# Altium PCB EVB-2.PCBDOC (part 5 of 6)
Units mil, origin at the board's own origin, x right, y up, seen from the top; angles counter-clockwise.
Board outline 2401.57 x 1771.65 mil, 6 copper layers (Top, Mid1-H, Mid2-PWR, GND, Mid3-V, Bottom), stack 59.449 mil thick; 172 components, 166 nets, 823 pads, 550 vias.
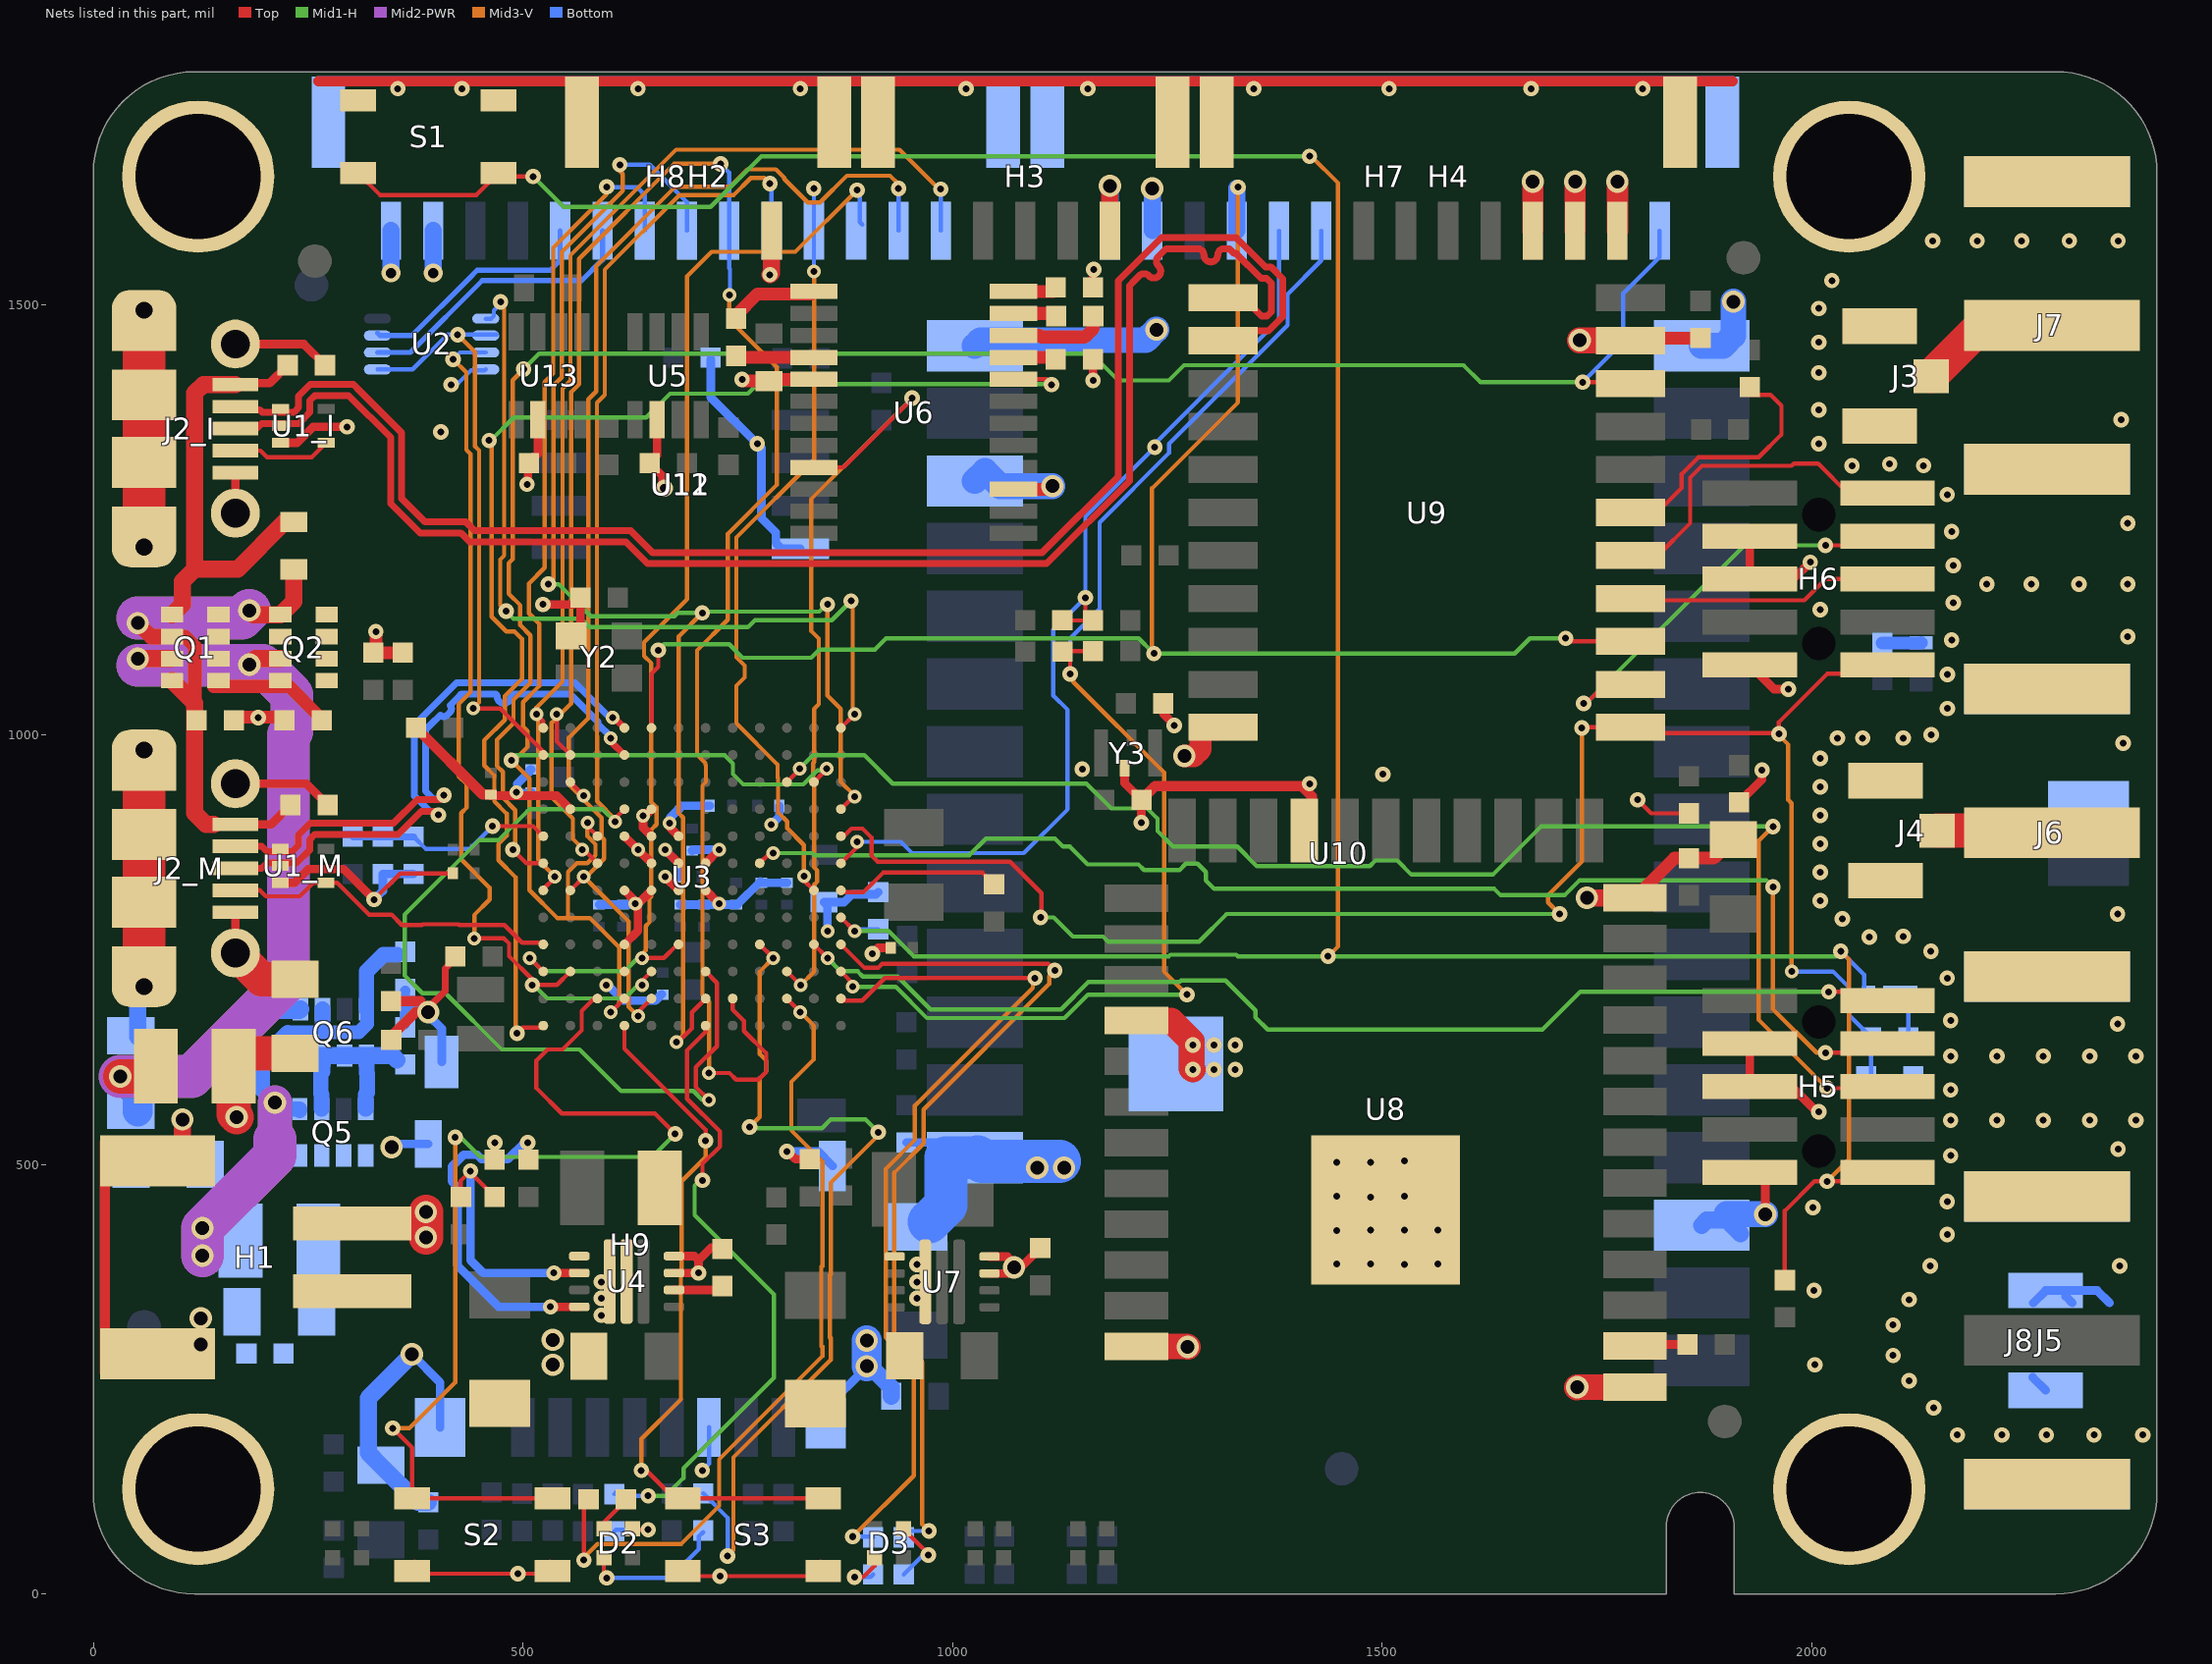
[diagram p7: the nets of this part, all layers, seen from the top]

## Via types
v1: diameter 18, hole 8, Top to Bottom, 385 vias
v2: diameter 16, hole 8, Top to Bottom, 100 vias
v3: diameter 26, hole 16, Top to Bottom, 58 vias
v4: diameter 22, hole 12, Top to Bottom, 3 vias
v5: diameter 20, hole 10, Top to Bottom, 2 vias
v6: diameter 18, hole 8.27, Top to Bottom, 2 vias

## Nets (pads, with @x,y where several pads share a name; then routed paths per layer and width w, separated by ;. In a path a pad name is that pad's centre, name@x,y a point inside that pad or via, vN(x,y) a via of type N, cw(c..) or ccw(c..) an arc to the next point about the centre after c; other vN are vias at no path point) (continued)
GND: BAT1.- C1.2 C2_I.2 C2_M.2 C3.2 C4.2 C5.1 C6.2 C7.2 C8.2 C9.1 C10.2 C11.2 C12.2 C13.1 C14.1 C15.2 C17.2 C18.2 C19.2 C20.2 C21.2 C22.1 C24.1 C25.1 C26.1 C27.1 C28.1 C29.2 C30.1 C31.2 C32.2 C33.2 C34.2 C35.2 C36.2 C37.2 C38.2 C39.2 C40.2 C41.1 C42.2 C43.2 C44.2 C45.2 C46.2 C47.2 C48.2 C49.2 C50.2 C51.1 C52.2 C53.2 C54.2 C55.2 C56.2 C57.1 H1.0 H1.2 H2.0 H2.1 H3.0 H3.1 H4.0 H4.1 H4.2 H4.3 H5.3 H5.5 H5.9 H6.3 H6.5 H6.9 H7.0 H7.1 H7.2 H8.0 H8.1 H8.2 H9.6 H9.M1 H9.M2 H9.M3 H9.M4 H9.S2 J2_I.5 J2_I.6 J2_I.7 J2_I.8 J2_I.9 J2_M.5 J2_M.6 J2_M.7 J2_M.8 J2_M.9 J3.2 J3.3 J4.2 J4.3 J5.2 J5.3 J5.4 J5.5 J6.2 J6.3 J6.4 J6.5 J7.2 J7.3 J7.4 J7.5 J8.2 J8.3 MP1.1 MP2.1 MP3.1 MP4.1 R1.2 R2.2 R4.2 R7.1 R13.1 R23.1 R47.1 R48.2 R49.2 S1.1 S2.2 S3.2 U1_I.3 U1_M.3 U2.4 U3.D2 U3.D5 U3.E4 U3.E5 U3.E6 U3.F5 U3.F6 U3.F7 U3.G4 U3.G5 U3.G6 U3.G7 U3.J4 U4.3 U4.4 U4.10 U4.11 U5.2 U6.5 U6.15 U7.3 U7.4 U7.10 U7.11 U8.1 U8.13 U8.21 U8.28 U8.36 U8.37 U9.11 U9.21 U10.1 U10.11 U10.13 U10.22 U10.35 U10.38 U11.4 U12.4 U13.2 V1.2 Y2.2 Y3.2 | length 11387.3
  Top w5: v1(326.79,808.11) 357.26,838.58 C8.2@418.3,838.58 ; S2.2@374.02,37.4 387.79,23.62 v1(494.12,23.62) 517.72,23.62 S2.2@531.5,37.4 ; C7.2@421.26,739.56 C7.2@421.26,742.13 ; R7.1@467.14,505.41 v1(467.14,525.1) ; S3.2@688.98,37.4 705.71,20.67 v1(729.33,20.67) 829.72,20.67 S3.2@846.46,37.4 ; R13.1@834.27,504.92 R13.1@834.25,505.92 ; v1(1797.24,924.21) 1813,908.46 R23.1@1857.05,908.46
  Top w6: U1_I.3@217.72,1339.76 U1_I.3@217.91,1339.76
  Top w8: v3@392.72,685.04 409.45,701.77 409.45,727.75 C7.2@421.26,739.56
  Top w10: J2_M.7@165.35,746.06 J2_M.5@165.35,793.31 ; J2_M.6@165.35,942.91 247.89,942.91 C2_M.2@272.64,918.17 ; J2_I.7@165.35,1257.87 J2_I.5@165.35,1305.12 ; J2_I.6@165.35,1454.72 244.94,1454.72 C2_I.2@269.55,1430.12 ; U1_M.3@217.52,827.76 234.25,827.76 250.16,843.66 291.24,843.66 v1(326.79,808.11) ; U1_I.3@217.91,1339.76 237.4,1339.76 255.9,1358.27 v1(295.27,1358.27) ; C11.2@462.6,930.11 462.6,929.13 539.37,929.13 U3.D2@555.12,913.39 ; v1(504.7,1291.46) 505.86,1292.63 505.86,1311.83 C57.1@507.02,1312.99 ; C57.1@509.63,1315.6 513.83,1319.8 513.83,1323.6 517.5,1327.26 U13.2@517.5,1364.11 ; v1(523.34,1151.63) 559.11,1151.63 C13.1@566.93,1159.45 566.93,1125.98 Y2.2@556.1,1115.16 ; U3.J4@618.11,755.91 633.86,771.65 v2@633.86,803.15 ; U3.G4@618.11,818.9 629.92,807.09 632.38,804.63 v2@633.86,803.15 ; U3.E4@618.11,881.89 v2(633.86,866.14) U3.F5@649.61,850.39 ; U3.G5@649.61,818.9 v2@633.86,803.15 ; U3.E5@649.61,881.89 639.89,891.61 v2(639.89,905.51) 641.73,905.51 U3.D5@649.61,913.39 ; U5.2@656.04,1366.6 656.04,1325.66 654.45,1324.07 654.45,1319.28 648.16,1312.99 650.59,1312.99 662.58,1301 662.58,1288.81 v5(664.5,1286.9) ; v2(665.35,834.65) U3.G6@681.1,818.9 ; v2(665.35,866.14) U3.F6@681.1,850.39 ; v2(670.89,897.14) 670.89,892.1 U3.E6@681.1,881.89 ; U4.10@675.8,373.52 v1(704.34,373.52) 704.34,388.29 ; U4.11@675.8,393.21 699.42,393.21 704.34,388.29 ; U3.G7@712.6,818.9 v2(728.35,803.15) ; U3.F7@712.6,850.39 v2(728.35,866.14) ; C15.2@737.81,403.05 719.11,403.05 704.34,388.29 ; v1(807.13,515) 808.14,515 817.23,505.91 R13.1@833.67,505.91 ; v1(906.54,745.12) 913.39,751.97 C19.2@928.14,751.97 ; U7.10@1042.93,373.03 v3@1071.47,373.03 ; U7.11@1042.93,392.72 1063.75,392.72 v3@1071.47,385 ; v3@1072.46,373.03 v3@1071.47,373.03 ; C21.2@1101.98,402.56 1079.42,380 v3(1071.47,380) v3@1071.47,373.03 ; v1(1163.39,1412.4) C22.1@1163.39,1437.01 ; C24.1@1163.39,1518.47 C24.1@1163.39,1520.67 1163.39,1540.35 v1(1164.37,1541.34) ; Y3.2@1200.26,960.91 1200.26,943.76 C25.1@1219.8,924.21 1220.47,923.55 1219.73,922.81 v1(1219.73,897.71) ; C26.1@1245.07,1036.42 1245.07,1024.62 1257.94,1011.75 v1(1257.94,1010.88) ; C30.1@1915.35,921.26 1941.93,947.84 v1(1941.93,958.66) ; H5.3@1927.87,640.55 H5.5@1927.87,590.55 1976.38,590.55 2005.9,561.02 v1(2007.87,561.02) ; H6.9@1927.87,1081.1 1955.83,1053.15 v1(1972.44,1053.15) ; H6.3@1927.87,1231.1 H6.5@1927.87,1181.1 1978.35,1181.1 v1(1998.03,1200.79) ; v3(1945.86,441.9) 1945.86,487.2 H5.9@1960.63,487.2
  Top w12: H1.0@13.28,257.87 H1.0@13.28,525.59 ; 261.81,1760.34 1059.06,1760.34 1110.24,1760.34 1907.48,1760.34 ; C5.1@346.46,689.96 380.52,689.96 ; C6.2@346.64,644.68 346.64,648.91 374.89,677.16 v3(389.76,677.16) ; C9.1@375.67,1008.09 453.55,930.21 462.5,930.21 C11.2@462.6,930.11 ; C25.1@1219.8,924.21 1235.66,940.07 1406.39,940.07 1418.31,928.15 U8.21@1418.31,911.42 ; U8.21@1409.13,888.35 U8.21@1409.13,917.01
  Top w15: R1.2@163.7,1020.47 R2.2@220.39,1020.47 ; v1(328.74,1120.08) 329,1119.82 329,1095.47 R4.2@360.24,1095.47 ; v1(754.92,1413.39) 756.69,1411.62 C17.2@786.42,1411.62 ; C17.2@789.37,1411.62 791.34,1413.59 U6.5@838.58,1413.59 ; U6.15@1070.87,1285.64 1112.41,1285.64 v3(1116.14,1289.37) ; U8.13@1793.94,810.22 1840.02,856.3 C27.1@1857.05,856.3 1885.83,856.3 C29.2@1908.46,878.94 ; U9.21@1796.89,1461.61 C28.1@1870.39,1461.61
  Top w20: H1.0@74.8,503.94 103.7,503.94 v3(103.7,552.17) ; v1(787.4,1535.43) 789.37,1537.4 H2.1@789.37,1586.61 ; H3.1@1183.07,1586.61 v3@1183.07,1638.86 ; U9.11@1306.1,1003.11 1305.12,1004.09 U9.11@1309.68,1008.66 ; v3(1738.19,810.22) U8.13@1793.94,810.22 ; U9.21@1793.94,1458.66 U9.21@1796.89,1461.61
  Top w25: H4.3@1675.2,1586.61 v3(1675.2,1643.7) ; H4.2@1724.41,1586.61 v3(1724.41,1643.7) ; H4.1@1773.62,1586.61 v3(1773.62,1643.7)
  Top w26: v3(1269.68,975.39) 1280.71,975.39 1288.39,983.07 U9.11@1288.39,1000.98
  Top w30: U8.36@1213.94,288.16 1272.86,288.16 v3(1273.62,287.4) ; U8.28@1213.94,667.37 1254.21,667.37 1278.19,643.4 1278.19,611.58 v1(1279.53,610.24) ; v3@1726.38,240.16 v3(1726.98,240.76) U8.1@1793.94,240.76 ; v3(1729.71,1459.06) 1793.54,1459.06 U9.21@1793.94,1458.66
  Top w40: J2_M.7@165.35,746.06 195.83,715.58 C1.2@230.81,715.58
  Top w50: J2_M.7@59.06,730.32 J2_M.9@59.06,805.12 J2_M.8@59.06,883.86 J2_M.6@59.06,958.66 ; J2_I.7@59.05,1242.13 J2_I.9@59.05,1316.93 J2_I.8@59.05,1395.67 J2_I.6@59.05,1470.47
  Bottom w5: v1(416.39,1407.48) 418.88,1409.97 425.47,1409.97 439.4,1423.89 455.39,1423.89 U2.4@456.69,1425.2 ; v1(708.7,143.71) 716.54,151.55 H9.6@716.54,193.9
  Bottom w10: v1(326.79,808.11) 337.03,818.36 R47.1@337.03,837.93 C3.2@372.85,837.93 ; v3(347.05,520) 350.67,523.62 H9.M4@389.76,523.62 ; v3(370.83,278.94) 403.54,246.22 H9.M1@403.54,193.9 ; v3(389.76,677.16) 389.76,673.55 405.51,657.8 H9.S2@405.51,619.09 ; v2(492.12,933.07) 493.27,934.22 493.27,942.84 507.94,957.51 507.94,958.74 508.84,959.64 C49.2@509.84,959.64 ; v2@498.82,932.18 508.94,932.18 C50.2@509.84,933.08 ; C48.2@588.58,802.17 C47.2@616.14,802.17 v2@633.86,802.17 ; v2(596.77,708.66) 597.92,707.51 599.89,707.51 616.74,690.66 654.2,690.66 C44.2@661.41,697.87 ; v2(665.35,866.14) 682.08,849.41 C43.2@682.08,834.65 ; v2(670.89,897.14) 670.89,903.17 685.04,917.32 C40.2@717.51,917.32 ; C46.2@683.07,802.17 C42.2@710.63,802.17 C39.2@748.03,802.16 749.37,802.16 776.27,829.05 C38.2@777.56,827.76 C36.2@807.09,827.76 ; C45.2@696.85,865.15 697.84,866.14 v2(728.35,866.14) ; C41.1@718.5,1437.01 718.5,1392.72 v1(772.64,1338.58) 777.56,1333.66 777.56,1252.05 794.37,1235.24 794.37,1223.15 801.18,1216.34 U11.4@822.83,1216.34 ; v2(789.06,895.35) 798.23,904.53 C37.2@798.23,917.32 ; v1(807.13,515) 843.27,515 H9.M3@860.24,498.03 ; H9.M2@852.36,198.82 852.36,216.13 v3@900.01,263.78 ; v2(854.33,771.65) 854.33,801.18 C35.2@850.39,805.12 873.73,805.12 882.92,814.31 910.77,814.31 C34.2@913.38,816.93 ; C32.2@946.17,525.59 1025.82,525.59 U10.1@1025.82,507.87 ; J8.2@2257.01,251.97 J8.2@2272.05,236.93 ; J8.3@2257.56,338.58 J8.3@2272.05,353.07 2331.97,353.07 2346.46,338.58 ; J8.3@2295.28,346.46 J8.3@2303.15,338.58
  Bottom w12: H8.0@261.81,1760.34 1059.06,1760.34 1110.24,1760.34 H7.0@1907.48,1760.34 ; R48.2@362.2,663.39 362.2,682.17 ; R49.2@363.02,701.77 362.2,700.96 362.2,682.17 ; v3(389.76,677.16) 384.76,682.17 362.2,682.17
  Bottom w20: C56.2@51.73,648.31 51.73,699.37 J2_M.7@59.06,706.69 ; v4(346.46,1537.4) H8.1@346.46,1586.61 ; v3(370.83,278.94) 319.88,227.99 319.88,164.37 C52.2@334.65,149.61 377.6,106.65 C51.1@389.76,106.65 ; v4(395.67,1537.4) H8.2@395.67,1586.61 ; v3@900.01,268.89 928.5,240.4 C31.2@928.5,230.32 ; H7.1@1183.07,1586.61 1183.2,1586.74 v3(1183.2,1638.86) ; H7.2@1232.28,1586.61 v3(1232.28,1635.83) ; U10.35@1871.82,429.13 1877.72,435.04 1900.87,435.04 U10.35@1916.62,419.29
  Bottom w30: U10.11@1025.82,1295.28 1037.63,1307.09 1055.35,1289.37 v3(1116.14,1289.37) ; U10.13@1025.82,1452.76 1032.18,1459.12 1224.87,1459.12 v3(1237.2,1471.46) ; U10.22@1871.82,1452.76 1896.73,1452.76 1908.46,1464.49 v3(1908.46,1503.94) ; U10.35@1900.87,441.9 v3(1945.86,441.9)
  Bottom w35: v3(900.01,265) v3(900.01,265) 900.01,268.89 v3(900.01,295)
  Bottom w40: U10.1@1025.82,507.87 1027.79,509.84 U10.1@1028.77,508.86
  Bottom w50: C33.2@972.62,433.25 992.13,452.76 992.13,507.87 U10.1@1025.82,507.87 ; U10.1@1028.77,508.86 1034.19,503.44 v3@1124.5,503.44
  other v1: 2169.29,185.04 2221.06,185.04 2272.82,185.04 2328.34,185.04 2385.02,185.04 2141.73,216.54 2113.01,248.03 2003.44,266.69 2094.49,277.56 2094.49,312.99 591.16,324.31 2113.01,342.52 591.16,344 958.67,344 2002.44,353.07 591.16,363.19 958.67,363.19 2137.8,381.89 2358.27,381.89 958.67,383.37 1525.59,383.37 1446.85,384.11 1486.22,384.11 1564.96,384.11 2157.48,418.31 1446.85,422.73 1486.22,423.23 1525.59,423.23 1564.96,423.23 2001.19,449.8 2157.48,456.69 1486.22,461.61 1446.85,463.09 1525.59,463.09 1446.85,502.13 1486.22,502.13 1525.59,503.94 2161.42,510.05 2356.3,517.7 2161.42,551.18 2215.35,551.18 2269.28,551.18 2323.22,551.18 2377.15,551.18 2161.42,586.61 1304.21,610.24 1329,610.24 2161.42,625.98 2215.35,625.98 2269.28,625.98 2323.22,625.98 2377.15,625.98 1279.53,638.72 1304.21,638.72 1329,638.72 2355.65,663.38 2161.42,667.37 2157.48,716.79 2138.54,748.03 2066.93,764.54 2106.3,765.31 2035.43,785.68 2355.65,791.34 2009.59,806.93 2009.59,840.03 2009.59,873.13 2009.59,906.23 2009.59,939.34 1415.35,942.91 1500.62,953.97 1150.81,960.02 2009.59,972.44 2362.2,990.16 2029.78,996.06 2059.06,996.06 2106.3,996.06 2138.96,1000 192.05,1020 2157.81,1030.56 2157.81,1070.13 2162.58,1110.24 2367.52,1114.17 2009.59,1145.67 2164.45,1153.54 2203.55,1175.19 2255.31,1175.19 2310.83,1175.19 2367.52,1175.19 2164.45,1196.85 2162.58,1236.46 2367.52,1246.06 2157.48,1279.53 2046.65,1312.99 2129.92,1313.14 2090.55,1314.96 2007.87,1338.58 404.53,1352.32 2359.84,1366.54 2007.87,1377.95 2007.87,1421.26 2007.87,1456.69 2007.87,1496.06 2023.2,1528.59 2140.57,1574.8 2192.33,1574.8 2244.09,1574.8 2299.61,1574.8 2356.3,1574.8 354.33,1751.97 429.13,1751.97 633.86,1751.97 822.83,1751.97 1015.75,1751.97 1157.48,1751.97 1350.39,1751.97 1507.87,1751.97 1673.23,1751.97 1803.15,1751.97
  other v2: 630.94,803.19
  other v3: 534.74,266.69 125,290.35 534.74,295.77 125,320.87 1098.43,496.06 1129.7,496.06
GPS1_ANT: J3.1 J7.1 | length 165.2
  Top w40: J3.1@2138.78,1417.32 2197.83,1476.38 J7.1@2279.53,1476.38
GPS2_ANT: J4.1 J6.1 | length 134.9
  Top w40: J4.1@2145.67,888.35 2277.01,888.35 J6.1@2279.53,885.83
GPS.TIMEPULSE: H7.14 U3.F1 U9.20 | length 2188.2
  Top w5: v1(488.19,866.14) 503.93,850.39 U3.F1@523.62,850.39 ; v1(1733.15,1410.32) 1792.28,1410.32 U9.20@1793.94,1408.66
  Mid1-H w5: v1(500.79,1425.42) 519.04,1443.67 1161.4,1443.67 1192.66,1412.4 1251.58,1412.4 1269.3,1430.12 1594.49,1430.12 1614.28,1410.32 v1(1733.15,1410.32)
  Mid3-V w5: v1(488.19,866.14) 491.07,869.02 491.07,912.21 476.62,926.65 476.62,956.73 469.91,963.45 469.91,994.17 489.03,1013.3 489.03,1040.84 508.78,1060.59 508.78,1115.6 496.84,1127.54 496.84,1150.59 483.5,1163.93 483.5,1199.75 488.11,1204.35 488.11,1412.74 v1(500.79,1425.42)
  Bottom w5: v1(1733.15,1410.32) 1780.51,1457.68 1780.51,1513.78 1822.83,1556.1 H7.14@1822.83,1586.61
H1.RAW: C55.1 I8.1 Q5.S1 Q6.G1 Q6.G2 R49.1 | length 578.1
  Mid2-PWR w40: 211.32,529.28 v3(211.32,571.85)
  Mid2-PWR w50: v3(126.99,393.7) v3(126.99,425.69) 211.32,510.01 211.32,529.28
  Bottom w16: 226.35,653.53 236.19,653.53 259.86,653.56 ; 266.73,660.43 259.86,653.56 ; Q6.G2@317.91,680.55 318.75,679.71 318.75,663.38 308.93,653.56 259.86,653.56
  Bottom w18: 226.35,653.53 196.85,624.03 196.85,586.32 v3(211.32,571.85) 218.77,564.41 Q5.S1@240.16,564.41 Q5.S1@240.16,562.51 ; 266.73,660.43 Q6.G1@266.73,680.55 ; Q6.G2@317.91,680.55 317.91,724.41 337.32,743.82 R49.1@353.51,743.82
H1_IN: C54.1 H1.1 I8.2 V1.1 | length 29.3
  Top w40: v3(387.05,415.06) v3(387.05,444.39)
Hdw-Detect-2: U3.K4
I2C0.SCL: H7.6 R18.2 R20.1 U3.K12 | length 1569.3
  Top w5: U3.K12@870.08,724.41 v2@885.83,708.66 ; R18.2@1119.09,1097.12 R20.1@1156.94,1097.12 ; v1(1136.81,1070.87) R18.2@1136.81,1088.6 ; R20.1@1154.53,1099.53 R20.1@1156.94,1097.12 ; R20.1@1163.39,1097.12 R20.1@1156.94,1097.12
  Mid1-H w5: v2(883.9,706.73) 933.66,706.73 970.1,670.29 1130.29,670.29 1157.5,697.49 v1(1272.69,697.49)
  Mid3-V w5: v1(1136.81,1070.87) 1136.81,1067.35 1140.59,1063.57 1140.59,1061.35 1246.07,955.87 1246.07,724.12 v1(1272.69,697.49)
  Bottom w5: v1(1136.81,1070.87) 1136.81,1112.27 1171.03,1146.49 1171.03,1247.1 1251.74,1327.81 1251.74,1338.35 1389.92,1476.54 1389.92,1512.71 1429.13,1551.92 H7.6@1429.13,1586.61
I2C0.SDA: H7.5 R17.2 R19.1 U3.F12 | length 1169.3
  Top w5: U3.F12@870.08,850.39 888.79,869.1 v2(888.79,875.31) ; R17.2@1127.74,1133.17 R17.2@1127.97,1132.94 ; R17.2@1136.81,1124.1 R17.2@1127.97,1132.94 ; R19.1@1154.53,1135.03 v1(1154.53,1159.45) ; R19.1@1163.39,1132.94 R17.2@1127.97,1132.94
  Mid3-V w5: v1@1235.24,1331.41 v1(1235.24,1334.65)
  Bottom w5: v2(888.79,875.31) 939.65,875.31 952.76,862.2 1082.88,862.2 1133.83,913.15 1133.83,1028.89 1117.21,1045.51 1117.21,1122.14 v1(1154.53,1159.45) 1154.53,1253.94 v1(1235.24,1334.65) 1235.24,1338.58 1379.92,1483.27 H7.5@1379.92,1586.61
I-CHIP_ERASE: R25.1 U9.17 | length 293.1
  Top w5: U9.17@1793.94,1258.66 1819.68,1258.66 1848.27,1287.24 1848.27,1303.35 1867.91,1322.99 1938.15,1322.99 1964.57,1349.41 1964.57,1382.87 1951.77,1395.67 R25.1@1927.87,1395.67
I-DATA-RDY: H7.4 U3.A5 U9.14 | length 1900.2
  Top w5: U3.A5@649.61,1007.87 649.61,1071.08 657.48,1078.95 v1(657.48,1098.42) ; v1(1713.48,1112.2) 1717.02,1108.66 U9.14@1793.94,1108.66
  Mid1-H w5: v1(657.48,1098.42) 664.29,1105.23 739.98,1105.23 755.6,1089.6 835.47,1089.6 844.99,1099.12 909.51,1099.12 922.55,1112.17 1216.57,1112.17 1232.34,1096.4 1234.31,1096.4 v1(1234.31,1094.54) 1654.19,1094.54 1671.86,1112.2 v1(1713.48,1112.2)
  Mid3-V w5: v1(1234.31,1094.54) 1232.12,1096.73 1232.12,1286.81 1332.07,1386.76 v1(1332.07,1637.19)
  Bottom w20: H7.4@1330.71,1586.61 v1@1330.71,1635.83
I-SWD.SWDCLK: H6.4 U9.13 | length 503.2
  Top w5: v1(1734.25,1036.33) 1737.22,1036.33 1759.55,1058.66 U9.13@1793.94,1058.66 ; v1(2015.75,1220.47) 2077.24,1220.47 H6.4@2087.87,1231.1
  Mid1-H w5: v1(1734.25,1036.33) 1737.22,1036.33 1921.36,1220.47 v1(2015.75,1220.47)
I-SWD.SWDIO: H6.2 U9.16 | length 383.7
  Top w5: U9.16@1793.94,1208.66 1820.87,1208.66 1858.27,1246.06 1858.27,1299.21 1872.05,1312.99 1976.38,1312.99 1979.1,1315.71 2007.06,1315.71 2041.67,1281.1 H6.2@2087.87,1281.1
I-SWD.SWO: H6.6 U9.15 | length 313.2
  Top w5: U9.15@1793.94,1158.66 1796.1,1156.5 1991.14,1156.5 2015.75,1181.1 2068.19,1181.1 2076.06,1188.98 2085.91,1179.13 H6.6@2087.87,1181.1
I-USB.D_N: J2_I.2 U1_I.1 U9.2 | length 1782.1
  Top w8: J2_I.2@165.35,1381.89 169.29,1377.95 193.9,1377.95 196.65,1375.2 217.91,1375.2 233.47,1375.2 238.97,1380.7 238.97,1394.16 252.49,1407.69 302.63,1407.69 310.24,1400.07 358.97,1351.34 358.97,1306.46 358.97,1274.58 385.99,1247.56 433.47,1247.56 443.62,1237.41 625.23,1237.41 650.54,1212.1 942.13,1212.1 967.81,1212.1 1104.21,1212.1 1192.71,1300.59 1192.71,1528.21 1236.78,1572.28 1243.24,1578.74 1329.79,1578.74 1364.38,1544.15 1370.71,1544.15 1384.06,1530.8 1384.06,1486.74 1367.59,1470.27 1344.02,1470.27 1343.82,1470.47 1343.5,1470.47 U9.2@1331.69,1458.66
I-USB.D_P: J2_I.3 U1_I.2 U9.1 | length 1795.7
  Top w8: J2_I.3@165.35,1356.3 189.96,1356.3 195.87,1362.2 217.91,1362.2 239.17,1362.2 251.97,1375 251.97,1388.78 257.87,1394.69 297.24,1394.69 345.97,1345.96 345.97,1311.85 345.97,1269.19 380.61,1234.56 428.08,1234.56 438.23,1224.41 619.85,1224.41 636.84,1207.41 645.16,1199.1 947.51,1199.1 962.43,1199.1 1109.6,1199.1 1205.71,1295.21 1205.71,1522.83 1211.37,1528.48 1217.02,1534.14 cw(c1222.68,1528.48) 1228.34,1534.14 1228.56,1533.92 ccw(c1234.22,1539.57) 1239.87,1533.92 ccw(c1234.22,1539.57) 1239.87,1545.23 1239.65,1545.46 cw(c1245.31,1551.11) 1239.65,1556.77 1245.31,1562.43 1245.97,1563.09 1248.62,1565.74 1268.52,1565.74 1276.52,1565.74 1285.04,1565.74 cw(c1285.04,1558.26) 1292.52,1558.26 ccw(c1300.52,1558.26) 1300.52,1550.26 ccw(c1300.52,1558.26) 1308.52,1558.26 cw(c1316,1558.26) 1316,1565.74 1322.06,1565.74 1327.71,1560.08 1330.06,1560.08 1359,1531.15 1365.33,1531.15 1371.06,1525.41 1371.06,1492.13 1366.04,1487.11 1359.42,1487.11 1350.96,1495.56 1350.96,1496.91 1339.21,1508.66 U9.1@1314.61,1508.66
I-USB.ID: J2_I.4 U1_I.4 | length 121.6
  Top w5: J2_I.4@169.29,1326.77 J2_I.4@165.35,1330.71 194.35,1330.71 202.22,1322.83 254.13,1322.83 U1_I.4@271.06,1339.76
I-VUSB: C2_I.1 J2_I.1 Q1.S1 R3.1 | length 528.1
  Top w10: J2_I.1@165.35,1407.48 167.04,1409.16 205.29,1409.16 C2_I.1@226.24,1430.12
  Top w20: Q1.S1@91.65,1139.76 103.46,1151.57 103.46,1178.27 118.11,1192.91 ; J2_I.1@165.35,1407.48 127.95,1407.48 118.11,1397.64 118.11,1192.91 ; R3.1@233.11,1247.56 222.74,1247.56 168.09,1192.91 118.11,1192.91
In-VSense: C3.1 R5.1 R47.2 U3.E1 | length 243.5
  Top w5: v1(464.57,893.7) 511.81,893.7 U3.E1@523.62,881.89
  Bottom w5: C3.1@372.85,881.23 387.16,866.92 437.79,866.92 v1(464.57,893.7)
  Bottom w8: R5.1@301.99,881.23 C3.1@372.85,881.23
INS-LED.Rx: R32.2 U3.J12 | length 1033.5
  Top w5: U3.J12@870.08,755.91 897.37,728.62 913.37,728.62 918.04,733.29 1111.19,733.29 v1(1118.83,725.64)
  Mid3-V w5: v1(972.44,73.35) 964.72,81.07 964.72,270.24 932.17,302.8 932.17,490.43 966.17,524.43 966.17,563.8 1112.33,709.95 1112.33,719.14 v1(1118.83,725.64)
  Bottom w5: R32.2@950.39,73.35 v1(972.44,73.35)
INS-LED.Tx: R36.2 U3.L12 | length 1026.4
  Top w5: U3.L12@870.08,692.91 872.44,690.55 894.95,690.55 921.19,716.79 v1(1095.83,716.79)
  Mid3-V w5: v1(883.86,66.71) 954.72,137.58 954.72,266.1 922.17,298.65 922.17,494.57 956.17,528.58 956.17,568.28 1093.34,705.44 1093.34,714.3 v1(1095.83,716.79)
  Bottom w5: v1(883.86,66.71) 906.72,66.71 R36.2@907.48,65.95
INS-R\S\T\: C53.1 H6.10 R54.1 U3.E12 U9.12 | length 2055.6
  Top w5: U3.E12@870.08,881.89 873.44,881.89 882.37,890.81 895.21,890.81 905.51,880.51 905.51,859.48 912.77,852.22 1066.78,852.22 1103.34,815.65 1103.34,788.38 v1(1102.36,787.4) ; v1(1732.28,1007.87) 1733.07,1008.66 1793.94,1008.66 1800.86,1001.74 1960.86,1001.74 v1(1961.61,1000.98) 1961.61,1014.77 2017.71,1070.87 2077.64,1070.87 H6.10@2087.87,1081.1
  Mid1-H w5: v1(1102.36,787.4) 1117.62,787.4 1139.88,765.14 1175.05,765.14 1181.1,759.09 1286.65,759.09 1318.9,791.34 v1(1706.4,791.34)
  Mid3-V w5: v1(1706.4,791.34) 1692.91,804.83 1692.91,813.22 1732.28,852.59 v1(1732.28,1007.87) ; v1(1961.61,1000.98) 1961.61,999.3 1972.44,988.48 1972.44,924.21 1976.38,920.28 v2(1976.38,724.41)
  Bottom w5: v1(1961.61,1000.98) v1@1962.3,1000.3 ; v2(1976.38,724.41) 2024.44,724.41 2043.31,705.54 2043.31,673.47 R54.1@2068.89,647.89 2068.89,604.33 C53.1@2062.99,598.43
INS.FB: R6.1 R7.2 U4.5 | length 313.2
  Top w5: R6.1@427.77,462.11 427.77,481.09 v1(438.9,492.22) 438.9,490.35 R7.2@467.14,462.11
  Top w10: v1(536.04,373.52) U4.5@565.57,373.52
  Bottom w10: v1(438.9,492.22) 438.9,388.34 453.71,373.52 v1(536.04,373.52)
INS.Grn: D3.4 R32.1 | length 80.2
  Top w5: D3.4@942.63,75.79 971.57,46.85 v1(971.57,45.28)
  Bottom w5: R32.1@943.21,22.64 965.84,45.28 v1(971.57,45.28)
INS.PG: R8.1 U4.7 | length 399.7
  Top w5: v1(505.53,525.1) 505.53,506.4 R8.1@506.51,505.41
  Top w10: v1@536.04,334.15 U4.7@565.57,334.15
  Bottom w10: v1(505.53,525.1) 501.48,525.1 482.48,506.1 451.9,506.1 446.77,511.22 431.03,511.22 417.32,497.52 417.32,480.32 423.9,473.74 423.9,382.12 471.87,334.15 v1(532.1,334.15)
INS.Red: D3.2 R36.1 | length 61.3
  Top w5: v1(885.82,19.69) 896.21,19.69 899.16,22.64 909.17,32.65 D3.2@909.17,42.32
  Bottom w5: v1(885.82,19.69) 904.52,19.69 R36.1@907.48,22.64
INS.SS/TR: C15.1 U4.9 | length 64.5
  Top w5: C15.1@731.9,353.84 C15.1@737.81,359.74
  Top w10: U4.9@675.8,353.84 C15.1@731.9,353.84
INS.SW: I3.1 U4.2
INV-UART-EN: U2.2 U2.5 U3.B1 | length 710.5
  Top w5: v2(441.95,1030.56) 473.57,1030.56 523.62,980.51 U3.B1@523.62,976.38
  Mid3-V w5: v1(424.1,1465.62) 444.13,1445.59 444.13,1335.68 449.03,1330.78 449.03,1037.64 v2(441.95,1030.56)
  Bottom w5: U2.5@330.71,1425.2 371.59,1425.2 412.02,1465.62 v1(424.1,1465.62) U2.2@469.56,1465.62
Lblu: D2.3 R10.1 | length 43.4
  Top w5: D2.3@594.11,75.79 594.11,83.28 615.76,104.94 R10.1@615.76,110.24
Lgrn: D2.4 R42.1 | length 58.7
  Top w5: D2.4@627.57,75.79 628.56,74.8 v1(645.67,74.8)
  Bottom w5: R42.1@606.3,72.83 608.27,74.8 v1(645.67,74.8)
LOG.blu: R10.2 U3.L10 | length 940.9
  Top w5: R10.2@568.9,106.68 R10.2@570.86,108.65 ; v1(570.86,39.37) R10.2@570.86,108.65 ; R10.2@572.46,110.24 R10.2@570.86,108.65 ; U3.L10@807.09,692.91 v2(822.83,677.17)
  Mid3-V w5: v1(570.86,39.37) 570.86,42.32 586.85,58.3 684.29,58.3 728.35,102.36 728.35,156.6 848.43,276.68 848.43,288.14 847.2,288.14 847.2,381.14 848.43,381.14 848.43,503.42 812.28,539.57 812.28,596.02 838.12,621.86 838.12,661.88 v2(822.83,677.17)
LOG.grn: R42.2 U3.M7 | length 738.6
  Top w5: v1(708.96,481.32) 708.96,500.59 729.1,520.72 729.1,538.33 691.03,576.39 691.03,632.61 712.6,654.17 U3.M7@712.6,661.42
  Mid1-H w5: v1(645.67,114.17) 666.05,114.17 686.78,134.9 686.78,146.19 792.13,251.54 792.13,272.4 792.13,348.62 699.8,440.94 699.8,475.32 705.81,481.32 v1(708.96,481.32)
  Bottom w5: R42.2@606.3,116.14 608.27,118.12 612.22,114.17 v1(645.67,114.17)
LOG.red: R40.2 U3.J9 | length 1050
  Top w5: U3.J9@775.59,755.91 v2(791.34,740.16)
  Mid1-H w5: v1(763.78,543.31) 764.97,542.11 848.04,542.11 858.15,552.22 898.56,552.22 v1(913.38,537.4)
  Mid3-V w5: v1(738.19,44.29) 744.85,50.95 744.85,158.96 858.43,272.54 858.43,298.14 857.2,298.14 857.2,371.14 858.43,371.14 858.43,478.87 913.38,533.82 v1(913.38,537.4) ; v1(763.78,543.31) 775.55,555.08 775.55,600.09 783.21,607.75 783.21,620.59 775.62,628.19 775.62,724.44 v2(791.34,740.16)
  Bottom w5: R40.2@709.65,117.13 738.19,88.58 v1(738.19,44.29)
Lred: D2.2 R40.1 | length 167.9
  Top w5: D2.2@594.11,42.32 594.11,24 597.44,20.67 v1(597.44,18.7)
  Bottom w5: v1(597.44,18.7) 671.26,18.7 704.72,52.17 704.72,66.93 R40.1@709.65,71.85
M-CHIP_ERASE: R53.1 U3.G12 | length 194.2
  Top w5: U3.G12@870.08,818.9 871.82,818.9 873.9,816.81 896.43,816.81 919.11,839.49 1034.64,839.49 R53.1@1048.34,825.79
M-G1/TXD1/TIOA1: U2.1 U3.A12 | length 974.8
  Top w5: U3.A12@870.08,1007.87 v2(885.83,1023.62)
  Mid1-H w5: v1(480.34,1143.76) 488.96,1135.13 567.5,1135.13 577.41,1125.23 761.97,1125.23 770.01,1133.28 859.37,1133.28 v1@881.75,1155.66
  Mid3-V w5: v1(473.87,1503.88) 478.11,1499.64 478.11,1208.5 473.5,1203.89 473.5,1150.6 v1(480.34,1143.76) ; v1(881.75,1155.71) 883.79,1153.67 883.79,1025.66 v2(885.83,1023.62)
  Bottom w5: U2.1@456.69,1484.25 462.95,1484.25 466.09,1487.4 466.09,1493.65 473.87,1501.43 v1(473.87,1503.88)
M-G1/TXD1/TIOA1_INV: H8.5 U2.7 | length 284.6
  Bottom w6: U2.7@330.71,1467.52 333.66,1464.57 370.81,1464.57 436.9,1530.66 ; 436.94,1530.66 446.9,1540.62 531.76,1540.62 543.31,1552.17 H8.5@543.31,1586.61
M-G2/RXD1/TIOB1: U2.3 U3.K2 U3.K5 | length 1061
  Top w5: v2(443.39,762.96) 477.96,762.96 483.88,757.04 483.88,742.23 510.92,715.19 v1(510.92,708.7) 539.4,708.7 U3.K2@555.12,724.41 ; v2@633.86,708.66 U3.K5@649.61,724.41
  Mid1-H w5: v1@516.63,704.57 528.04,693.16 618.36,693.16 v2@633.86,708.66
  Mid3-V w5: v1(418.82,1437.01) 434.13,1421.7 434.13,1331.54 439.03,1326.64 439.03,1049.56 425.12,1035.65 425.12,951.66 434.61,942.17 434.61,915.37 428.07,908.82 428.07,855.11 461.38,821.79 461.38,808.12 443.39,790.14 v2(443.39,762.96)
  Bottom w5: v1(418.82,1437.01) 426.69,1444.88 U2.3@456.69,1444.88
  other v2: 638.78,708.66
M-G2/RXD1/TIOB1_INV: H8.6 U2.6 | length 340.4
  Bottom w6: U2.6@330.71,1444.88 369.05,1444.88 452.76,1528.59 568.37,1528.59 592.52,1552.74 H8.6@592.52,1586.61
M-G3/SCK1/TIOA0/QDA: H8.7 U3.C11 U3.E3 U3.L4 | length 1784.4
  Top w5: v2(575.12,897.64) 575.12,893.38 U3.E3@586.61,881.89 ; v2(602.36,677.17) U3.L4@618.11,692.91 ; U3.C11@838.58,944.88 v2@850.39,956.69
  Mid1-H w5: v1(486.41,970.28) 492.26,976.13 734.77,976.13 744.34,966.55 744.34,954.21 756.38,942.17 826.29,942.17 842.78,958.66 v2@854.33,958.66
  Mid3-V w5: v2(575.12,897.64) 575.12,881.83 584.4,872.56 584.4,859.72 575.07,850.39 562.58,850.39 552.44,840.26 552.44,787.64 553.37,786.7 ; v1(597.44,1637.61) 597.44,1629.14 535.22,1566.92 535.22,1420.33 525.37,1410.49 525.37,1194.38 506.84,1175.84 506.84,1154.73 506.84,1141.2 518.78,1129.26 518.78,1056.45 500.25,1037.92 500.25,1009.33 505.44,1004.14 505.44,985.86 489.86,970.28 v1(486.41,970.28) 488.13,968.56 507.62,949.06 507.62,819.02 539.94,786.7 553.37,786.7 ; v2(602.36,677.17) 612.27,687.08 612.27,752.17 577.74,786.7 553.37,786.7
  Bottom w5: v1(597.44,1637.61) 598.01,1637.04 632.82,1637.04 641.73,1628.13 H8.7@641.73,1586.61
  other v2: 853.39,960.68
M-G4/CS1/TIOB0/QDB: H8.8 U3.D12 U3.L7 | length 1843.3
  Top w5: v2(678.69,642.18) 680.55,642.18 696.64,658.28 696.64,676.96 U3.L7@712.6,692.91 ; U3.D12@870.08,913.39 v2@885.83,929.13
  Mid1-H w5: v1(529.52,1175.19) 541.58,1175.19 578.85,1137.93 676.4,1137.93 680.2,1141.73 704.33,1141.73 v1@708.66,1146.06 ; v1(708.66,1141.73) 710.2,1143.28 844.9,1143.28 853.2,1151.57 v1(854.33,1151.57)
  Mid3-V w5: v1(529.52,1175.19) 535.59,1181.26 535.59,1406.56 545.22,1416.19 545.22,1562.05 616.14,1632.98 616.14,1652.66 612.8,1656.01 v1(612.8,1663.39) ; v2(678.69,642.18) 686.39,649.88 686.39,903.56 681.35,908.6 681.35,1114.42 v1(708.66,1141.73) ; v1(854.33,1151.57) 854.33,1045.54 869.83,1030.04 869.83,945.13 885.87,929.09 v2(885.87,928.19)
  Bottom w5: v1(612.8,1663.39) 647.41,1663.39 690.94,1619.85 H8.8@690.94,1586.61
M-G5/DA0/TIOA6/AD4: H8.9 U3.B2 U3.F3 U3.L8 | length 2310.2
  Top w5: v2(539.37,1023.62) 539.37,992.13 U3.B2@555.12,976.38 ; v2@570.87,866.14 U3.F3@586.61,850.39 ; v2(716.53,606.3) 740.41,606.3 748.03,598.67 774.14,598.67 783.21,607.75 783.21,629.23 757.3,655.14 757.3,666.89 744.09,680.1 U3.L8@744.09,692.91
  Mid3-V w5: v2(568.9,866.14) 568.9,868.11 558.1,878.91 558.1,902.53 533.37,927.26 533.37,1013.69 541.34,1021.65 556.05,1036.37 556.05,1398.74 565.22,1407.9 565.22,1553.77 675.82,1664.37 v1(729.93,1664.37) ; v2(716.53,606.3) 716.53,689.22 708.91,696.85 708.91,940.94 712.85,944.88 712.85,964.57 712.35,965.06 712.35,967.05 702.61,976.79 702.61,1098.2 738.29,1133.88 738.29,1233.62 795.28,1290.61 795.28,1428.15 740.16,1483.27 v2(740.16,1511.81)
  Bottom w5: v1(729.93,1664.37) 740.16,1654.14 H8.9@740.16,1586.61 740.16,1543.02 740.91,1542.27 740.91,1512.56 v2(740.16,1511.81)
M-G6/DA1/TIOB6/AD5: H8.10 U3.D4 U3.K7 | length 1927.3
  Top w5: v2(607.12,898.78) 607.12,902.4 U3.D4@618.11,913.39 ; U3.K7@712.6,724.41 725.81,711.2 725.81,637.49 701.03,612.72 701.03,590.3 v2(716.53,574.8)
  Mid1-H w5: v2(607.12,898.78) 592.76,913.14 507.34,913.14 471.4,877.2 448.99,877.2 362.28,790.48 362.28,719.82 383.02,699.09 409.78,699.09 475.21,633.66 565.86,633.66 614.22,585.3 698.26,585.3 708.76,574.8 v2(716.53,574.8)
  Mid3-V w5: v2(607.12,898.78) 607.12,901.7 586.37,922.46 586.37,998.55 586.05,998.86 586.05,1386.31 595.22,1395.48 595.22,1541.34 681.74,1627.87 745.05,1627.87 765.13,1647.95 780.9,1647.95 v1(787.4,1641.45)
  Bottom w5: v1(787.4,1641.45) 789.37,1639.48 H8.10@789.37,1586.61
M-G7/TIOB7/AD10: H8.11 U3.G11 | length 900.1
  Top w5: v2(826.99,835.53) 826.99,830.49 U3.G11@838.58,818.9
  Mid3-V w5: v2(826.99,835.53) 826.99,871.57 807.33,891.22 807.33,899 796.84,909.49 796.84,949.67 796.39,950.11 796.39,965.15 748.29,1013.26 748.29,1057.04 758.03,1066.78 758.03,1080.45 748.29,1090.2 748.29,1229.48 838.83,1320.03 838.83,1539.12 v2(838.58,1539.37)
  Bottom w5: v1(838.39,1635.82) 838.58,1635.62 H8.11@838.58,1586.61 v2(838.58,1539.37)
M-G8/TIOB10/AD4: H8.12 U3.J6 U3.K1 | length 1325.9
  Top w5: v2(507.87,740.16) U3.K1@523.62,724.41 ; v2@633.86,740.16 664.03,740.16 679.78,755.91 U3.J6@681.1,755.91
  Mid1-H w5: v2(507.87,740.16) 523.37,724.66 618.36,724.66 v2@633.86,740.16
  Mid3-V w5: v2@633.86,740.16 642.86,749.16 642.86,777.35 647.15,781.64 647.15,809.32 649.36,811.53 649.36,889.51 655.39,895.54 655.39,903.56 655.39,915.48 649.36,921.51 649.36,1083.21 640.98,1091.59 640.98,1107.68 690.94,1157.64 690.94,1533.46 719.49,1562.01 816.93,1562.01 v1(888.78,1633.86)
  Bottom w5: v1(888.78,1633.86) 891.89,1630.75 891.89,1596.66 H8.12@894.87,1593.69
  other v2: 638.78,740.16
M-G9/TIOA9/AD1: H8.13 U3.C2 U3.G2 U3.L5 | length 1501.4
  Top w5: U3.G2@555.12,818.9 v2(570.87,834.65) ; U3.C2@555.12,944.88 v2(570.87,929.13) ; v2(633.89,672.28) 633.89,677.2 U3.L5@649.61,692.91
  Mid3-V w5: v2(633.89,672.28) 622.8,683.36 622.8,782.71 v2(570.87,834.65) 573.47,834.65 594.4,855.58 594.4,877.93 591.44,880.89 591.44,903.24 570.87,923.82 v2(570.87,929.13) 566.3,929.13 553.37,942.06 553.37,996.55 576.05,1019.23 576.05,1390.46 585.22,1399.62 585.22,1545.48 677.6,1637.87 740.91,1637.87 760.99,1657.95 794.23,1657.95 803.9,1648.28 803.9,1646.97 831.55,1619.32 845.7,1619.32 876.97,1650.59 927.17,1650.59 937.01,1640.75 v1(937.01,1635.82)
  Bottom w5: H8.13@937.01,1586.61 v1(937.01,1635.82)
M-G10/TIOB9/AD2: H8.14 U3.A1 U3.G1 | length 1338
  Top w5: v2(515.75,1023.62) 523.62,1015.75 U3.A1@523.62,1007.87 ; U3.G1@523.62,818.9 523.62,820.13 536.94,833.45 v2(536.94,834.69)
  Mid3-V w5: v2(536.94,834.69) 536.94,835.17 517.62,854.49 517.62,1021.74 v2(515.75,1023.62) 515.75,1031.5 546.05,1061.8 546.05,1402.88 555.22,1412.05 555.22,1557.91 678.18,1680.87 938.22,1680.87 984.17,1634.92 v1(986.27,1634.92)
  Bottom w5: H8.14@986.22,1586.61 H8.14@986.22,1586.61 v1(986.27,1634.92)
M-R\E\S\E\T\: C34.1 D7.C H5.10 R9.1 S1.2 U3.H12 | length 3904.8
  Top w5: S1.2@308.09,1653.71 333.65,1628.15 445.92,1628.15 S1.2@471.48,1653.71 475.5,1649.69 v1(511.81,1649.69) ; U3.H12@870.08,787.4 v2(885.83,771.65) ; R9.1@1968.5,365.21 1968.5,445.87 2002.95,480.31 v1(2017.71,480.31) 2077.64,480.31 H5.10@2087.87,490.55 ; v1@2033.46,746.06 v1(2033.46,748.03)
  Mid1-H w5: v1(511.81,1649.69) 547.32,1614.17 718.35,1614.17 777.41,1673.23 807.51,1673.23 v1(1415.35,1673.23) ; v2(885.83,771.65) 925.3,771.65 954.81,742.14 1111.99,742.14 1251.58,742.14 1253.43,743.99 1330,743.99 1331.85,742.14 v1(1437.01,742.14) 2027.58,742.14 v1(2033.46,748.03)
  Mid3-V w5: v1(1415.35,1673.23) 1417.32,1673.23 1448.59,1641.96 1448.59,753.72 v1(1437.01,742.14) ; v1(2017.71,480.31) 2043.31,505.91 2043.31,738.19 v1(2033.46,748.03)
  Bottom w5: v2(885.83,771.65) 887.8,773.62 C34.1@913.38,773.62 ; v1(2033.46,748.03) 2060.86,720.63 2060.86,699.23 D7.C@2065.94,694.15
M-SW-CFG: S2.1 U3.L3 | length 1240.8
  Top w5: v1(348.43,192.91) 371.06,170.28 S2.1@371.06,111.22 S2.1@534.45,111.22 ; U3.L3@586.61,692.91 582.6,692.91 568.33,678.64 568.33,655.95 546.04,633.66 528.62,633.66 515.75,620.78 515.75,588.58 545.28,559.06 653.54,559.06 v1(677.16,535.43)
  Mid1-H w5: v1(421.26,531.5) 427.64,531.5 450.54,508.6 650.33,508.6 v1(677.16,535.43)
  Mid3-V w5: v1(348.43,192.91) 367.91,192.91 421.26,246.26 v1(421.26,531.5)
M-SW-LOG: S3.1 U3.M4 | length 812.9
  Top w5: U3.M4@618.11,661.42 618.11,634.64 712.6,540.15 v1(712.6,527.56) ; v1(637.79,143.7) 643.62,143.7 676.1,111.22 S3.1@686.02,111.22 S3.1@849.41,111.22
  Mid3-V w5: v1(637.79,143.7) 637.79,180.42 683.84,226.47 683.84,375.6 684.67,376.42 684.67,480.36 712.6,508.29 v1(712.6,527.56)
M-SWD.SWDCLK: H5.4 U3.F9 | length 1543.3
  Top w5: U3.F9@775.59,850.39 787.4,862.2 v2(791.34,862.2) ; v1(2015.75,629.92) 2077.24,629.92 H5.4@2087.87,640.55
  Mid1-H w5: v2(791.34,862.2) 836.38,862.2 838.77,859.81 1019.5,859.81 1038.7,879.01 1119.13,879.01 1128.42,869.72 1136.53,869.72 1157.18,849.07 1216.24,849.07 1222.74,842.57 1264.12,842.57 1271.35,849.81 1285.02,849.81 1294.69,840.14 1294.69,830.32 1304.35,820.66 1314.46,820.66 1630.42,820.66 1637.85,813.22 1712.2,813.22 1729.7,830.72 1946.84,830.72 v1(1954.72,822.83)
  Mid3-V w5: v1(1954.72,822.83) 1954.72,680.53 2005.34,629.92 v1(2015.75,629.92)
M-SWD.SWDIO: H5.2 U3.J11 | length 1345.5
  Top w5: U3.J11@838.58,755.91 v2(854.33,740.16) ; v1(2019.68,700.79) 2077.64,700.79 H5.2@2087.87,690.55
  Mid1-H w5: v2(854.33,740.16) 869.83,724.66 889.52,724.66 895.56,718.62 935.91,718.62 974.24,680.29 1126.15,680.29 1158.01,712.14 1264.01,712.14 1265.86,713.99 1317.57,713.99 1352.52,679.04 1352.52,670.96 1366.75,656.73 1686.44,656.73 1730.5,700.79 v1(2019.68,700.79)
M-SWD.SWO: H5.6 U3.C10 | length 1671.1
  Top w5: U3.C10@807.09,944.88 821.89,959.69 v2(821.89,960.68) ; v1(2017.72,588.58) 2085.91,588.58 H5.6@2087.87,590.55
  Mid1-H w5: v2(821.89,960.68) 837.39,976.18 897.33,976.18 930.37,943.14 1155.72,943.14 1184.65,914.21 1226.56,914.21 1238.45,902.33 1238.45,887.95 1256.59,869.81 1331.34,869.81 1353.99,847.16 1485.62,847.16 1492.12,853.66 1517.45,853.66 1533.95,837.16 1628.78,837.16 1684.79,893.16 v1(1954.72,893.16)
  Mid3-V w5: v1(1954.72,893.16) 1938.22,876.66 1938.22,668.07 v1(2017.72,588.58)
M-USB.D_N: J2_M.2 U1_M.1 U3.B4 | length 676.1
  Top w8: J2_M.2@165.35,870.08 195.93,870.08 202.22,863.78 231.3,863.78 238.83,871.31 238.83,883.27 252.41,896.86 349.3,896.86 376.94,924.5 402.84,924.5 v1(408.11,929.77) ; v2@602.36,992.13 U3.B4@618.11,976.38
  Bottom w8: v1(408.11,929.77) 403.54,925.2 395.67,925.2 386.81,934.06 386.81,1004.67 386.81,1005.91 392.47,1011.56 403.78,1022.88 ccw(c407.71,1026.81) 411.65,1022.88 415.1,1026.33 ccw(c411.16,1030.26) 415.1,1034.19 423.72,1042.81 428.47,1047.56 445.94,1047.56 453.94,1047.56 466.86,1047.56 cw(c466.86,1044.48) 469.94,1044.48 ccw(c477.94,1044.48) 477.94,1036.48 ccw(c477.94,1044.48) 485.94,1044.48 cw(c489.02,1044.48) 489.02,1047.56 496.06,1047.56 554.8,1047.56 587.33,1015.04 587.33,1012.64 602.36,997.61 v2(602.36,996.06)
M-USB.D_P: J2_M.3 U1_M.2 U3.A4 | length 685.9
  Top w8: J2_M.3@165.35,844.49 195.93,844.49 202.22,850.78 236.68,850.78 251.83,865.93 251.83,877.89 257.8,883.86 354.68,883.86 381.62,910.8 v1@403.54,910.8 ; v2@602.36,1023.62 U3.A4@618.11,1007.87
  Bottom w8: v1@405.51,907.48 402.2,910.8 391.69,910.8 377.62,924.86 373.81,928.67 373.81,1011.29 377.62,1015.1 422.76,1060.24 423.08,1060.56 560.19,1060.56 601.06,1019.68 v2(604.33,1019.68)
  other v1: 401.57,906.5
M-USB.ID: J2_M.4 U1_M.4 U3.J1 | length 398
  Top w5: J2_M.4@165.35,818.9 193.9,818.9 200.79,812.01 240.16,812.01 255.91,827.76 U1_M.4@270.67,827.76 283.81,827.76 320.98,790.59 347.19,790.59 359.12,778.66 382.27,778.66 382.95,779.33 424.95,779.33 425.83,778.46 478.43,778.46 499.02,757.87 521.65,757.87 U3.J1@523.62,755.91
M-VUSB: C2_M.1 J2_M.1 Q1.G1 Q1.G2 Q2.S1 R1.1 R3.2 | length 640.4
  Top w10: J2_M.1@165.35,895.67 165.45,895.77 206.93,895.77 C2_M.1@229.33,918.17
  Top w16: Q1.G1@91.65,1114.17 106.85,1114.17 118.11,1102.91 118.11,1036.54
  Top w18: v3(51.73,1129.92) 67.48,1114.17 Q1.G1@91.65,1114.17
  Top w20: Q1.G2@91.65,1062.99 118.11,1036.54 118.11,908.78 131.22,895.67 J2_M.1@139.97,895.67 ; v3(181.65,1144.69) 186.57,1139.76 Q2.S1@217.64,1139.76 233.11,1155.24 R3.2@233.11,1192.44
  Mid2-PWR w50: v3@51.73,1135.83 172.8,1135.83 v3(181.65,1144.69)
MUSB-INT: C56.1 I1.1 Q1.S2 Q2.S2 | length 943.2
  Top w20: v3(51.73,1088.58) Q1.S2@91.65,1088.58 ; v3(181.65,1081.69) 188.54,1088.58 Q2.S2@217.64,1088.58
  Top w40: v3(31.5,602.36) I1.1@58.11,602.36 ; I1.1@58.66,600 I1.1@72.83,614.17
  Mid2-PWR w50: v3(31.5,602.36) 114.17,602.36 227.11,715.3 227.11,999.91 231.05,1003.85 231.05,1046.51 196.85,1080.71 v3@51.73,1080.71
  Bottom w35: v3(31.5,602.36) 51.73,582.13 C56.1@51.73,561.69
MUSB.5V: C1.1 I1.2 Q6.S1 | length 310.9
  Top w40: v3(166.78,555.12) 163.39,558.51 I1.2@163.39,614.17 178.18,628.97 C1.1@230.81,628.97
  Bottom w20: v3(166.78,555.12) 166.78,641.44 204.72,679.38 239.97,679.38 Q6.S1@241.14,680.55
NetC16_1: C16.1 U6.4 | length 92.9
  Top w15: C16.1@748.03,1444.88 753.73,1439.18 U6.4@838.58,1439.18
NetC16_2: C16.2 U6.1 | length 102.1
  Top w15: C16.2@748.03,1488.19 772.77,1512.93 835.56,1512.93 U6.1@838.58,1515.95
NetC22_2: C22.2 U6.21 | length 49.3
  Top w15: U6.21@1070.87,1439.18 1119.87,1439.18 C22.2@1120.08,1438.98
NetC23_1: C23.1 U6.22 | length 114
  Top w15: U6.22@1070.87,1464.77 1101.21,1464.77 1103.09,1462.89 1154.13,1462.89 1163.39,1472.15 1163.39,1487.2 C23.1@1163.39,1488.98
NetC23_2: C23.2 U6.23 | length 50.9
  Top w15: U6.23@1070.87,1490.36 1115.94,1490.36 C23.2@1120.08,1486.22
NetC24_2: C24.2 U6.24 | length 50.3
  Top w15: U6.24@1070.87,1515.95 1117.56,1515.95 C24.2@1120.08,1518.47
NetD6_C: D6.C R26.2 | length 45.1
  Bottom w15: R26.2@2082.05,1106.78 2126.81,1106.78 D6.C@2127.05,1107.02
NetD7_A: D7.A R54.2 | length 50.1
  Bottom w5: D7.A@2102.83,694.15 2112.2,684.78 R54.2@2112.2,647.89
NetQ1_D1: Q1.D1 Q1.D2 Q2.G1 Q2.G2 R2.1 | length 148.4
  Top w15: Q1.D2@139.72,1056.19 Q2.G2@210.84,1056.19 ; Q2.G2@217.64,1062.99 Q2.G2@210.84,1056.19 ; R2.1@263.7,1020.47 227.98,1056.19 Q2.G2@210.84,1056.19
NetQ2_D1: Q2.D1 Q2.D2
NetQ5_D1: Q5.D1 Q5.D2
NetQ5_G1: Q5.G1 Q5.G2 Q6.D1 Q6.D2 R48.1 | length 241.2
  Bottom w18: Q5.G1@265.75,564.41 265.75,581.19 264.75,582.19 264.75,605.67 266.76,607.68 Q6.D1@266.73,626.54 ; Q5.G2@316.93,564.41 316.93,581.48 318.75,583.3 318.75,598.28 318.9,598.43 318.75,598.57 318.75,605.67 318.02,606.41 318.02,626.43 Q6.D2@317.91,626.54
  Bottom w20: Q6.D1@241.14,626.54 Q6.D1@266.73,626.54 Q6.D2@292.32,626.54 Q6.D2@317.91,626.54 348.45,626.54 R48.1@353.51,621.47
NetR22_1: R22.1 U8.2 | length 62
  Top w10: U8.2@1793.94,288.8 1795.49,290.35 R22.1@1855.32,290.35
RS232.RxD: U3.K10 U6.9 | length 918.7
  Top w5: U3.K10@807.09,724.41 v2(823.04,708.45) ; U6.9@838.58,1311.23 873.24,1311.23 v1@951.77,1389.76
  Mid1-H w5: v1@951.77,1389.76 952.76,1390.75 v1(952.76,1391.73)
  Mid3-V w5: v2(823.04,708.45) 823.12,708.45 838.83,724.16 838.83,825.46 842.49,829.11 842.49,841.95 838.83,845.61 838.83,946.99 837.89,947.93 837.89,967.1 838.83,968.04 838.83,1030.04 844.33,1035.54 844.33,1111.88 835.63,1120.58 835.63,1274.61 v1(952.76,1391.73)
RS232.TxD: U3.M1 U6.20 | length 1515.8
  Top w5: v1(493.13,652.59) 499.74,659.2 521.4,659.2 U3.M1@523.62,661.42 ; U6.20@1070.87,1413.59 1108.99,1413.59 v1(1115.1,1407.48)
  Mid1-H w5: v1(460.63,1342.52) 462.55,1342.52 489.13,1369.09 643.38,1369.09 671.17,1396.89 761.76,1396.89 773.1,1408.23 1114.35,1408.23 v1(1115.1,1407.48)
  Mid3-V w5: v1(460.63,1342.52) 463.5,1339.65 463.5,1137.26 480.68,1120.08 490.16,1120.08 498.78,1111.46 498.78,1064.73 479.03,1044.98 479.03,1017.44 455.12,993.53 455.12,964.09 466.62,952.59 466.62,922.51 481.07,908.07 481.07,882.35 471.69,872.97 471.69,853.91 491.38,834.22 491.38,654.34 v1(493.13,652.59)